# Altium PCB PCB-Thermostat.PcbDoc (part 2 of 5)
Units mm, origin at the board's own origin, x right, y up, seen from the top; angles counter-clockwise.
Board outline 100 x 90 mm, 4 copper layers (Top, PWR, GND, Bottom), stack 1.585 mm thick; 187 components, 164 nets, 696 pads, 417 vias.
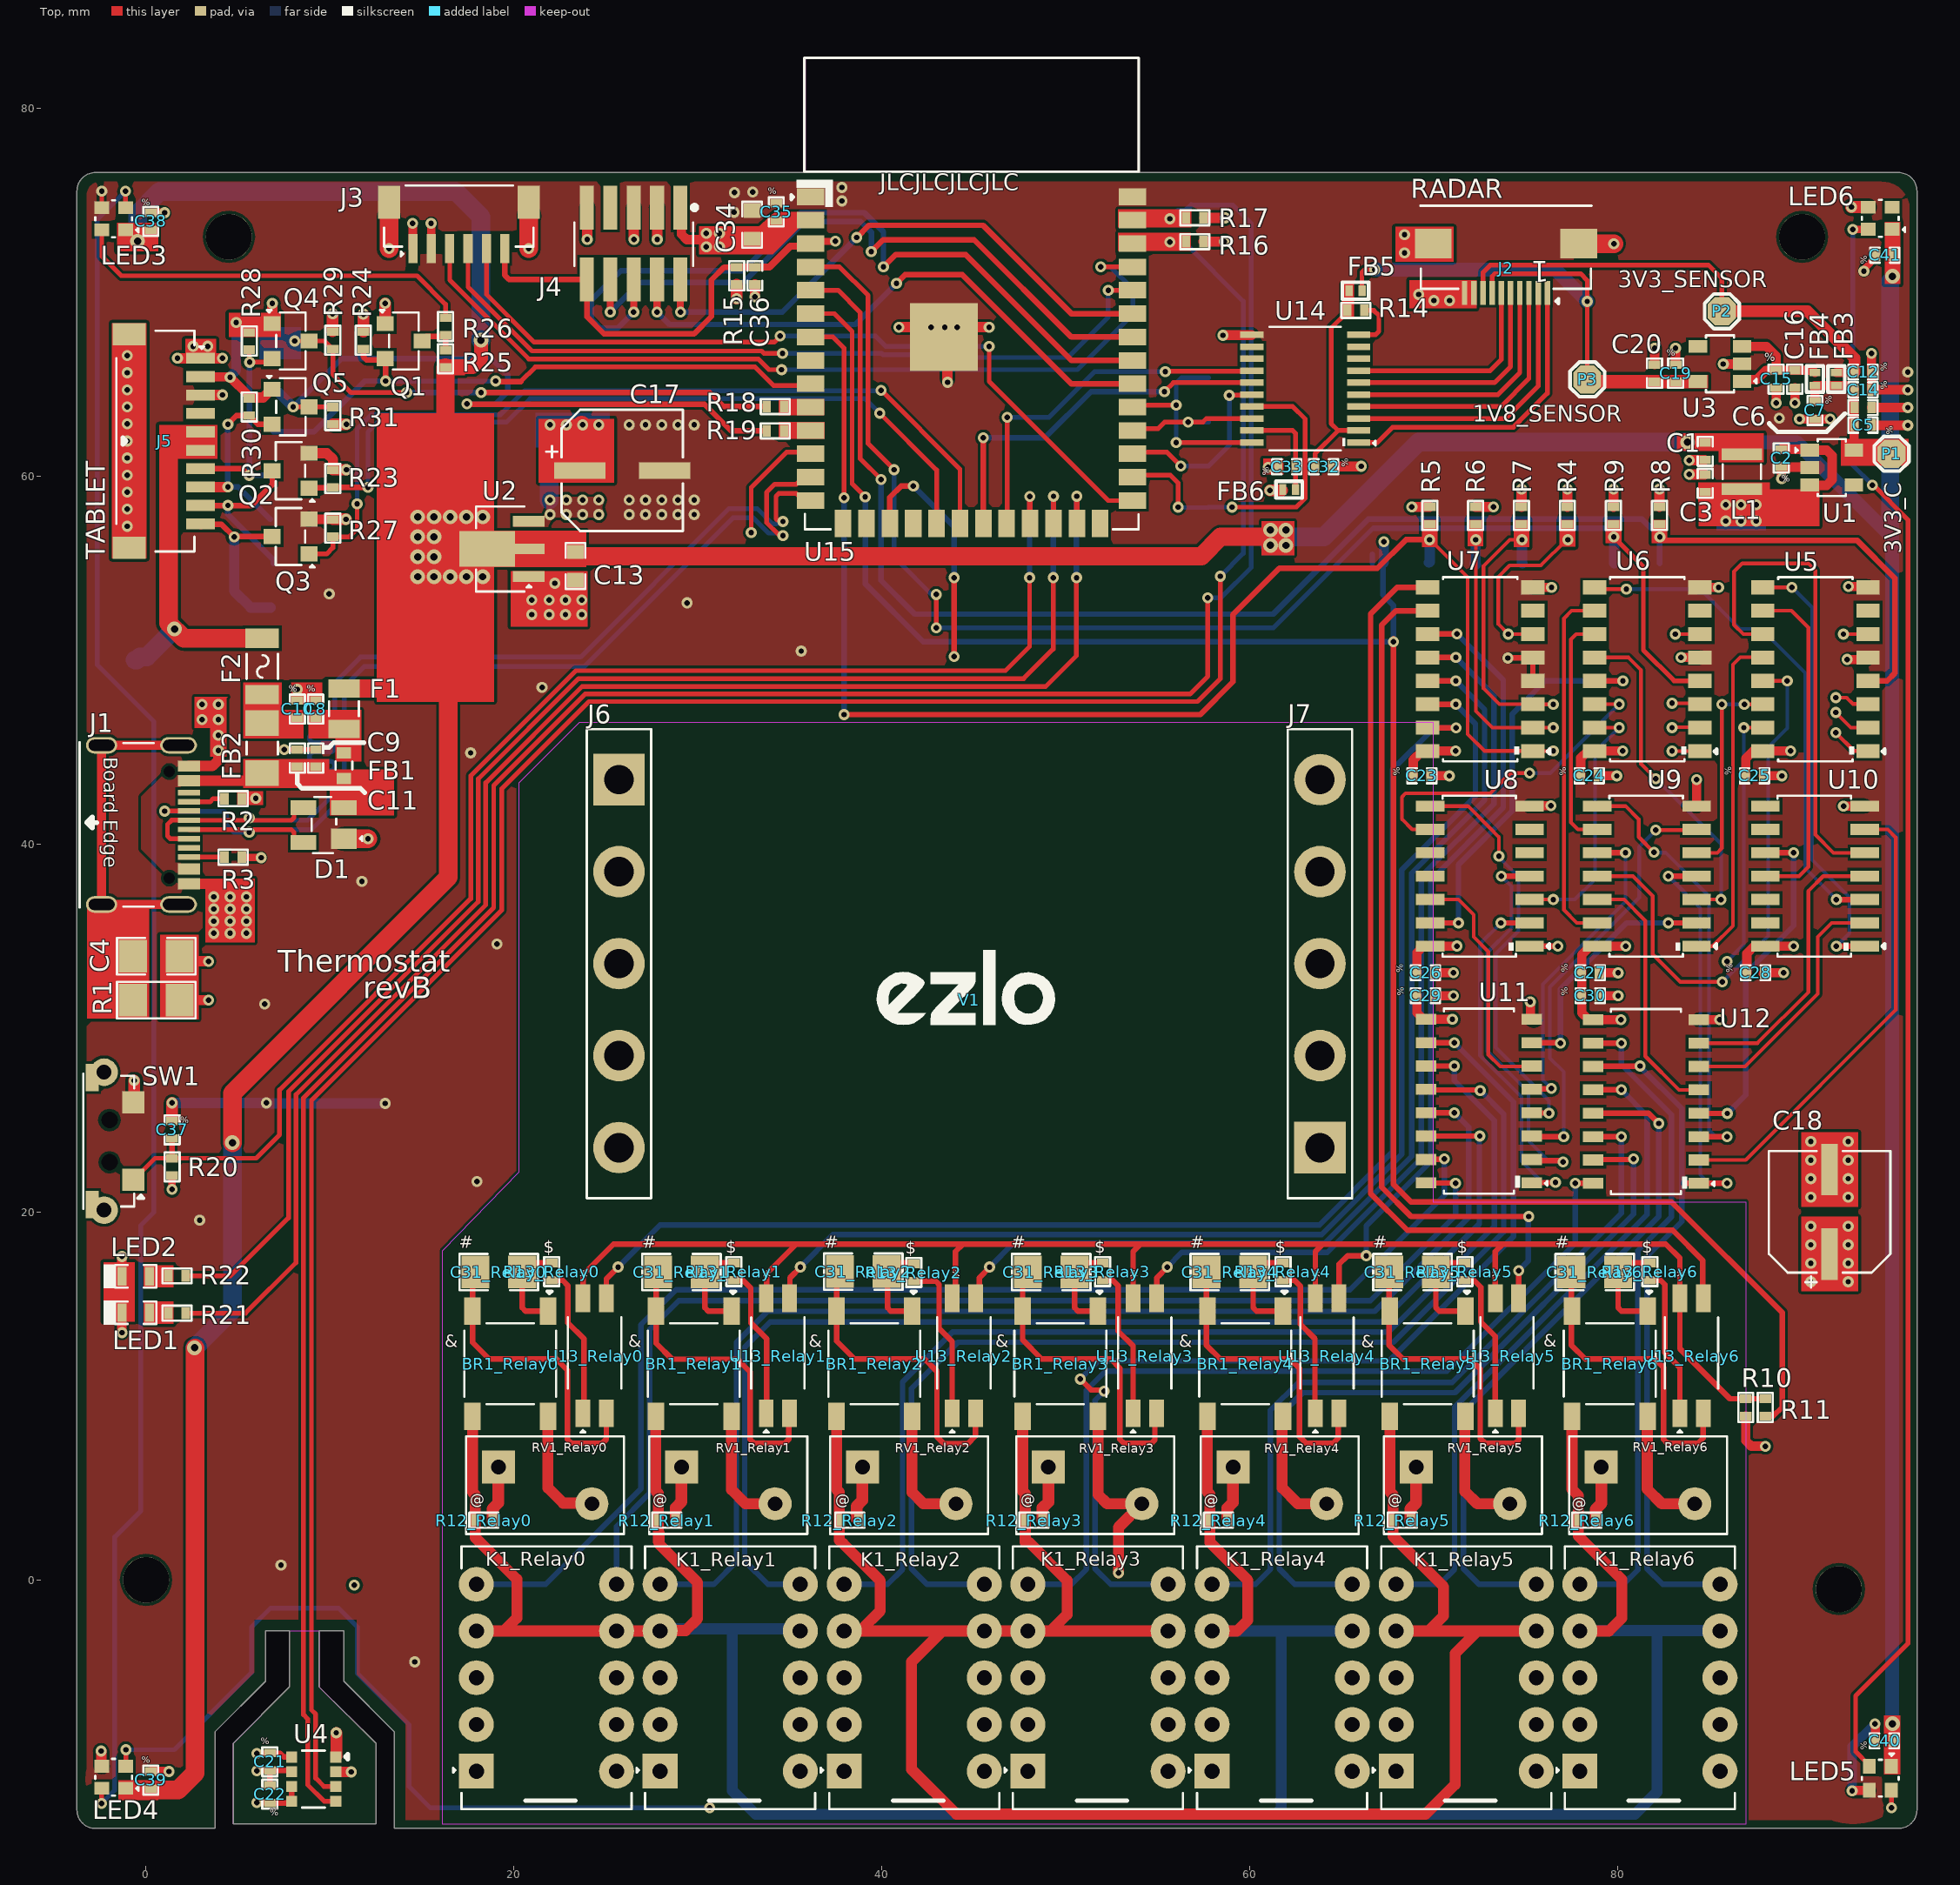
[diagram p0: Top view]

## Part data (continued)
FB3 FB4 FB5 FB6: library part BLM15PD121SN1D, "FERRITE BEAD 120 OHM 0402 1LN", Case Code (Imperial)=0402, Case Code (Metric)=1005, Current Rating=1.3A, DC Resistance (DCR)=90mR, LCSC Part Number=C76891, Manufacturer=Murata, Max Operating Temperature=125°C, Min Operating Temperature=-55°C, Package Quantity=1, Tolerance=25%, Case/Package=0402, Category="Ferrite Beads and Chips", ComponentLink1Description=https://datasheet.ciiva.com/11800/0900766b811b5866-11800860.pdf?src-supplier=RSComponents, ComponentLink1URL=https://datasheet.ciiva.com/11800/0900766b811b5866-11800860.pdf?src-supplier=RSComponents, ComponentLink2Description=https://datasheet.ciiva.com/18093/getdatasheetpartid-195858-18093157.pdf?src-supplier=Verical, ComponentLink2URL=https://datasheet.ciiva.com/18093/getdatasheetpartid-195858-18093157.pdf?src-supplier=Verical, ComponentLink3Description=https://datasheet.ciiva.com/41425/001171686-da-01-en-chip-drossel0402-120r-1300ma-1-0x0-5mm-41425776.pdf?src-supplier=Conrad, ComponentLink3URL=https://datasheet.ciiva.com/41425/001171686-da-01-en-chip-drossel0402-120r-1300ma-1-0x0-5mm-41425776.pdf?src-supplier=Conrad, ComponentLink4Description=https://datasheet.ciiva.com/41449/001172205-da-01-en-drossel-0402-120r-11-0x0-5mm-10000st-41449495.pdf?src-supplier=Conrad, ComponentLink4URL=https://datasheet.ciiva.com/41449/001172205-da-01-en-drossel-0402-120r-11-0x0-5mm-10000st-41449495.pdf?src-supplier=Conrad, ComponentLink5Description=https://datasheet.ciiva.com/1012/l0110e-1012435.pdf?src-supplier=Digi-Key, ComponentLink5URL=https://datasheet.ciiva.com/1012/l0110e-1012435.pdf?src-supplier=Digi-Key, ComponentLink6Description=https://datasheet.ciiva.com/1012/l0110e-1012434.pdf?src-supplier=Digi-Key, ComponentLink6URL=https://datasheet.ciiva.com/1012/l0110e-1012434.pdf?src-supplier=Digi-Key, ComponentLink7Description=https://datasheet.ciiva.com/1012/l0110e-1012436.pdf?src-supplier=Digi-Key, ComponentLink7URL=https://datasheet.ciiva.com/1012/l0110e-1012436.pdf?src-supplier=Digi-Key, Core Material=Ferrite, DC Current=1.3A, DC Resistance-Max=90mR, Depth=0.55mm, Height=0.5mm, Impedance=120R, Item Type="Ferrite Bead", Lead Free="Lead Free", Length=1mm, Manufacturer Part Number=BLM15PD121SN1D, Material=Steel,Ferrite, Max Current Rating=1.3A, Max DC Current=1.3A, Military Standard=Not, Number of Circuits=1, Number of Lines=1, Number of Pins=2, Packaging="Tape and Reel", Pricing 1="10000=0.03238, 20000=0.03063, 40000=0.02888, 60000=0.02713, 80000=0.02538, 100000=0.02363, 1000000=0.02188 (USD)", Radiation Hardening=No, Reach SVHC Compliant=Yes, RoHS=Yes, RoHS Compliant=Yes, Series=BLM15PD, Stock 1=300000, Supplier 1=Avnet, Supplier Part Number 1=BLM15PD121SN1D, Termination=SMD/SMT, Test Frequency=100MHz, Width=0.5mm
J1: "250mA 1 16 Female Type-C SMD USB Connectors ROHS", LCSC Part Number=C165948, Manufacturer="Korean Hroparts Elec", ComponentLink1Description=LCSC, ComponentLink1URL=https://www.lcsc.com/product-detail/USB-Connectors_Korean-Hroparts-Elec-TYPE-C-31-M-12_C165948.html, Manufacturer Part Number=TYPE-C-31-M-12
J2: "Clamshell 10 Bottom Contact Surface Mount 0.5mm SMD,P=0.5mm FFC/FPC Connectors ROHS", LCSC Part Number=C262266, Manufacturer=JUSHUO, Package=SMD,P=0.5mm, ComponentLink1Description=LCSC, ComponentLink1URL=https://www.lcsc.com/product-detail/FFC-FPC-Connectors_JUSHUO-AFC01-S10FCC-00_C262266.html, Item Type="FPC Connector", Manufacturer Part Number=AFC01-S10FCC-00
J3: library part C145963, "1x6P SH 1 1mm 6 SMD,P=1mm Wire To Board / Wire To Wire Connector ROHS", Manufacturer=BOOMELE, Package=SMD,P=1mm, ComponentLink1Description=LCSC, ComponentLink1URL=https://www.lcsc.com/product-detail/Wire-To-Board-Wire-To-Wire-Connector_BOOMELE-Boom-Precision-Elec-C145963_C145963.html, Item Type=Connector, LCSC Part Number=C145963, Manufacturer Part Number=C145963
J4: "CONN HEADER SMD 10POS 1.27MM", Color=Black, Contact Resistance=30mR, Current Rating=1A, Insulation Resistance=100MR, LCSC Part Number=C150517, Manufacturer="Amphenol FCI", Max Operating Temperature=85°C, Max Voltage Rating (AC)=125V, Min Operating Temperature=-40°C, Package Quantity=600, Supplier Part Number 1=609-3695-6-ND, ComponentLink1Description=https://www.verical.com/server-webapp/html/getDatasheet?partID=177140&src-supplier=Verical, ComponentLink1URL=https://www.verical.com/server-webapp/html/getDatasheet?partID=177140&src-supplier=Verical, ComponentLink2Description=http://portal.fciconnect.com/Comergent/fci/drawing/20021121.pdf?src-supplier=Avnet, ComponentLink2URL=http://portal.fciconnect.com/Comergent/fci/drawing/20021121.pdf?src-supplier=Avnet, ComponentLink3Description=https://cdn.amphenol-icc.com/media/wysiwyg/files/drawing/20021121.pdf?src-supplier=Digi-Key, ComponentLink3URL=https://cdn.amphenol-icc.com/media/wysiwyg/files/drawing/20021121.pdf?src-supplier=Digi-Key, ComponentLink4Description=http://portal.fciconnect.com/Comergent/fci/drawing/20021121.pdf?src-supplier=Avnet+Europe, ComponentLink4URL=http://portal.fciconnect.com/Comergent/fci/drawing/20021121.pdf?src-supplier=Avnet+Europe, ComponentLink5Description=https://media.digikey.com/pdf/Data%20Sheets/FCI%20PDFs/Minitek%20127_Catalog.pdf?src-supplier=Digi-Key, ComponentLink5URL=https://media.digikey.com/pdf/Data%20Sheets/FCI%20PDFs/Minitek%20127_Catalog.pdf?src-supplier=Digi-Key, ComponentLink6Description=http://portal.fciconnect.com/Comergent//fci/drawing/20021121.pdf?src-supplier=Mouser, ComponentLink6URL=http://portal.fciconnect.com/Comergent//fci/drawing/20021121.pdf?src-supplier=Mouser, Connector Type="Male Pin,Header", Contact Material="Copper Alloy,Copper,Gold", Contact Mating Length=0.12inch, Contact Plating=Gold, Depth=3.4mm, Gender=Male, Housing Color=Black, Housing Material=Thermoplastic, Item Type="Jtag Header", Length=6.35mm, Manufacturer Part Number=20021121-00010C4LF, Mount="Surface Mount", Number of Contacts=10, Number of Positions=10, Number of Rows=2, Orientation=Straight, Packaging="Tape and Reel", Pitch=1.27mm, Pricing 1="1=0.87, 10=0.761, 100=0.6563 (USD)", Radiation Hardening=No, REACH SVHC="No SVHC", Row Spacing=0.05inch, Stack Height=3mm, Stock 1=0, Supplier 1=Digi-Key, Termination=Solder, Voltage Rating=125V
J5: "CONN HEADER SMD R/A 10POS 1MM", Color=Natural, Contact Resistance=40mR, Current Rating=1A, Flammability Rating="UL94 V-0", Housing Color=Beige, Insulation Resistance=100MR, LCSC Part Number=C160409, Manufacturer=JST, Max Operating Temperature=85°C, Max Voltage Rating (AC)=50V, Min Operating Temperature=-25°C, Supplier Part Number 1=1165778, Category=Connectors, ComponentLink1Description=https://datasheet.ciiva.com/26894/getdatasheetpartid-708886-26894682.pdf?src-supplier=Verical, ComponentLink1URL=https://datasheet.ciiva.com/26894/getdatasheetpartid-708886-26894682.pdf?src-supplier=Verical, ComponentLink2Description=https://datasheet.ciiva.com/16221/sm10b-srss-tblfsn-16221242.pdf?src-supplier=Future+Electronics, ComponentLink2URL=https://datasheet.ciiva.com/16221/sm10b-srss-tblfsn-16221242.pdf?src-supplier=Future+Electronics, ComponentLink3Description=https://datasheet.ciiva.com/11752/0900766b8082f550-11752172.pdf?src-supplier=RSComponents, ComponentLink3URL=https://datasheet.ciiva.com/11752/0900766b8082f550-11752172.pdf?src-supplier=RSComponents, ComponentLink4Description=https://datasheet.ciiva.com/712/esr-712644.pdf?src-supplier=Digi-Key, ComponentLink4URL=https://datasheet.ciiva.com/712/esr-712644.pdf?src-supplier=Digi-Key, ComponentLink5Description=https://datasheet.ciiva.com/712/esr-712645.pdf?src-supplier=Digi-Key, ComponentLink5URL=https://datasheet.ciiva.com/712/esr-712645.pdf?src-supplier=Digi-Key, ComponentLink6Description=https://datasheet.ciiva.com/730/esr-730692.pdf?src-supplier=Digi-Key, ComponentLink6URL=https://datasheet.ciiva.com/730/esr-730692.pdf?src-supplier=Digi-Key, Connector Type=Header, Contact Finish - Mating=TIN, Contact Material="Copper Alloy", Contact Plating=Tin,Lead,Copper, Contact Shape=Square, Contact Type="Male Pin", Depth=4.95mm, Fastening Type=Pull, Gender=Male, Housing Material=Polyamide, Insulation Color=Natural, Insulation Material=Nylon, Item Type="JST Connector", Lead Free="Lead Free", Lead Pitch=1mm, Length=12mm, Manufacturer Part Number=SM10B-SRSS-TB(LF)(SN), Material=Polyamide, Max Current Rating=1A, Mount="Surface Mount", Number of Contacts=10, Number of Positions=10, Number of Rows=1, Orientation="Right Angle", Packaging="Tape and Reel", Pitch=1mm, Pricing 1="3000=0.64500 (USD)", Reach SVHC Compliant=Yes, RoHS=Yes, Series=SR, Supplier 1="Future Electronics", Termination=Solder, Voltage Rating=50V, Voltage Rating (AC)=50V
J6 J7: "PinHeader_1x05_P5.00mm_Vertical"
K1_Relay0 K1_Relay1 K1_Relay2 K1_Relay3 K1_Relay4 K1_Relay5 K1_Relay6: "Relay Gen Purpose DPDT 1A 3VDC", Coil Current=46.7mA, Coil Power=140mW, Coil Resistance=64.3R, Coil Voltage (DC)=3V, Contact Current Rating=1A, LCSC Part Number=C1560650, Manufacturer=KEMET, Max Operating Temperature=85°C, Min Operating Temperature=-40°C, Package Quantity=3600, Supplier Part Number 1=80-EA2-3TNU, Category=Uncategorized, Coil Type="Latching, Dual Coil", ComponentLink1Description=https://api.kemet.com/component-edge/download/datasheet/EA2-3TNU.pdf?src-supplier=Digi-Key, ComponentLink1URL=https://api.kemet.com/component-edge/download/datasheet/EA2-3TNU.pdf?src-supplier=Digi-Key, Contact Material=Gold,Silver, Item Type=Relay, Manufacturer Part Number=EA2-3TNU, Mount="Through Hole", Operate Time=2ms, Packaging=Rail/Tube, Pricing 1="1=3.85000, 10=3.11000, 50=3.11000, 100=2.42000, 250=2.00000, 500=1.85000, 1000=1.85000, 3600=1.58000, 10000=1.58000 (USD)", Relay Type="General Purpose", Release Time=1ms, RoHS=No, RoHS Compliant=No, Stock 1=873, Supplier 1=Mouser, Termination="PC Pin", Throw Configuration=DPDT
L1: library part VLS252012HBX-100M-1, "FIXED IND 10UH 1A 540 MOHM SMD", Case Code (Imperial)=1008, Case Code (Metric)=2520, Current Rating=1A, DC Resistance (DCR)=540mR, Inductance Tolerance=20%, LCSC Part Number=C88532, Manufacturer=TDK, Max Operating Temperature=105°C, Min Operating Temperature=-40°C, Resistor Type=Wirewound, Saturation Current=850mA, Test Frequency=1MHz, Case/Package=1008, Category="Fixed Inductors", ComponentLink1Description=http://www.farnell.com/datasheets/1866267.pdf?src-supplier=Farnell, ComponentLink1URL=http://www.farnell.com/datasheets/1866267.pdf?src-supplier=Farnell, ComponentLink2Description=http://www.farnell.com/datasheets/2608160.pdf?src-supplier=Farnell, ComponentLink2URL=http://www.farnell.com/datasheets/2608160.pdf?src-supplier=Farnell, ComponentLink3Description=http://www.farnell.com/datasheets/2130011.pdf?src-supplier=Element14, ComponentLink3URL=http://www.farnell.com/datasheets/2130011.pdf?src-supplier=Element14, ComponentLink4Description=http://www.farnell.com/datasheets/1866267.pdf?src-supplier=Newark, ComponentLink4URL=http://www.farnell.com/datasheets/1866267.pdf?src-supplier=Newark, ComponentLink5Description=https://product.tdk.com/info/en/catalog/datasheets/inductor_commercial_power_vls252012hbx-1_en.pdf?src-supplier=Digi-Key, ComponentLink5URL=https://product.tdk.com/info/en/catalog/datasheets/inductor_commercial_power_vls252012hbx-1_en.pdf?src-supplier=Digi-Key, ComponentLink6Description=https://product.tdk.com/info/en/catalog/datasheets/inductor_commercial_power_vls252012hbx-1_en.pdf?ref_disty=digikey&src-supplier=Digi-Key, ComponentLink6URL=https://product.tdk.com/info/en/catalog/datasheets/inductor_commercial_power_vls252012hbx-1_en.pdf?ref_disty=digikey&src-supplier=Digi-Key, Core Material=Metal, Height - Seated (Max)=0.047inch, Inductance=10uH, Item Type=Inductor, Length=0.098inch, Manufacturer Part Number=VLS252012HBX-100M-1, Mount="Surface Mount", Packaging="Cut Tape", Pricing 1="2000=0.12770, 24000=0.12640 (USD)", Reach SVHC Compliant=Yes, RMS Current (Irms)=1A, RoHS=Yes, RoHS Compliant=Yes, Series=VLS-HBX-1, Shielding=Shielded, Stock 1=10000, Supplier 1="Arrow Electronics", Supplier Part Number 1=VLS252012HBX-100M-1, Tolerance=20%, Width=0.079inch
LED1: library part 19-21/R7C-AK1L2BY/3T, "Red 632nm LED Indication - Discrete 2.05V 0603 (1608 Metric)", LCSC Part Number=C1322287, Manufacturer="Everlight Elec", Package=0603, ComponentLink1Description=LCSC, ComponentLink1URL=https://www.lcsc.com/product-detail/Light-Emitting-Diodes-LED_Everlight-Elec-19-21-R7C-AK1L2BY-3T_C1322287.html, Item Type=LED, Manufacturer Part Number=19-21/R7C-AK1L2BY/3T
LED2: library part 19-21/G6C-FM1N2B/3T, "Yellow-Green 572nm LED Indication - Discrete 2.05V 0603 (1608 Metric)", LCSC Part Number=C93689, Manufacturer="Everlight Elec", Package=0603, ComponentLink1Description=LCSC, ComponentLink1URL=https://www.lcsc.com/product-detail/Light-Emitting-Diodes-LED_Everlight-Elec-19-21-G6C-FM1N2B-3T_C93689.html, Item Type=LED, Manufacturer Part Number=19-21/G6C-FM1N2B/3T
LED3 LED4 LED5 LED6: "5mA -40℃~+80℃ RGB SMD,2x2mm Light Emitting Diodes (LED) ROHS", LCSC Part Number=C2909058, Manufacturer="OPSCO Optoelectronics", Package=SMD,2x2mm, ComponentLink1Description=LCSC, ComponentLink1URL=https://www.lcsc.com/product-detail/Light-Emitting-Diodes-LED_OPSCO-Optoelectronics-SK6812-EC20_C2909058.html, Item Type="RGB LED", Manufacturer Part Number=SK6812-EC20
P1 P2 P3 P4 P5 P6 P7 P8 P9 P10 P11 P12 P13 P14 P15 P16 P17 P18 P19 P20 P21 P22 P23 P24 P25: "Test Point ON"
Q1 Q2 Q3 Q4 Q5: "N-CHANNEL 20-V (D-S) MOSFET", LCSC Part Number=C5310968, Manufacturer="TECH PUBLIC", Manufacturer Part Number=SI2302CDS, Package=SOT-23, ComponentLink1Description=LCSC, ComponentLink1URL=https://www.lcsc.com/product-detail/MOSFETs_TECH-PUBLIC-SI2302CDS_C5310968.html, Item Type=Mosfet
R1: library part RC1206FR-071ML, "RES 1M OHM 1% 1/4W 1206", Case Code (Imperial)=1206, Case Code (Metric)=3216, LCSC Part Number=C108083, Manufacturer=Yageo, Max Operating Temperature=155°C, Max Power Dissipation=250mW, Min Operating Temperature=-55°C, Package Quantity=5000, Resistance=1MR, Resistance Tolerance=1%, Resistor Type="Thick Film", Temperature Coefficient=100ppm/°C, Voltage Rating=200V, Case/Package=1206, Category="Chip SMD Resistors", ComponentLink1Description=https://datasheet.ciiva.com/11819/0900766b80c6630a-11819912.pdf?src-supplier=RSComponents, ComponentLink1URL=https://datasheet.ciiva.com/11819/0900766b80c6630a-11819912.pdf?src-supplier=RSComponents, ComponentLink2Description=https://datasheet.ciiva.com/46445/444357-46445709.pdf?src-supplier=Element14, ComponentLink2URL=https://datasheet.ciiva.com/46445/444357-46445709.pdf?src-supplier=Element14, ComponentLink3Description=https://datasheet.ciiva.com/7857/444357-7857289.pdf?src-supplier=Element14, ComponentLink3URL=https://datasheet.ciiva.com/7857/444357-7857289.pdf?src-supplier=Element14, ComponentLink4Description=https://datasheet.ciiva.com/7857/444357-7857288.pdf?src-supplier=Element14, ComponentLink4URL=https://datasheet.ciiva.com/7857/444357-7857288.pdf?src-supplier=Element14, ComponentLink5Description=https://datasheet.ciiva.com/17033/pyu-rc1206-51-rohs-l-4-17033611.pdf?src-supplier=Future+Electronics, ComponentLink5URL=https://datasheet.ciiva.com/17033/pyu-rc1206-51-rohs-l-4-17033611.pdf?src-supplier=Future+Electronics, Construction=Rectangular, Depth=1.6mm, Features="Moisture Resistant", Height=0.55mm, Item Type=Resistor, Lead Free="Lead Free", Length=3.1mm, Manufacturer Part Number=RC1206FR-071ML, Military Standard=Not, Number of Terminations=2, Packaging="Tape and Reel", Power Rating=250mW, Pricing 1="5000=0.00412, 10000=0.00406, 20000=0.00394 (USD)", RoHS=Yes, RoHS Compliant=Yes, Series=RC, Size Code=1206, Stock 1=935000, Supplier 1=Avnet, Supplier Part Number 1=RC1206FR-071ML, Technology="THICK FILM", Termination=SMD/SMT, Tolerance=1%, Width=1.6mm
R2 R3: library part RC0402FR-075K1L, "RES 5.1K OHM 1% 1/16W 0402", Case Code (Imperial)=0402, Case Code (Metric)=1005, LCSC Part Number=C137973, Manufacturer=Yageo, Max Operating Temperature=155°C, Max Power Dissipation=63mW, Min Operating Temperature=-55°C, Package Quantity=1, Resistance=5.1kR, Resistance Tolerance=1%, Resistor Type="Thick Film", Temperature Coefficient=100ppm/°C, Voltage Rating=50V, Case/Package=0402, Category="Chip SMD Resistors", ComponentLink1Description=https://datasheet.ciiva.com/7983/1018594-7983519.pdf?src-supplier=Element14, ComponentLink1URL=https://datasheet.ciiva.com/7983/1018594-7983519.pdf?src-supplier=Element14, ComponentLink2Description=https://datasheet.ciiva.com/46394/1018594-46394936.pdf?src-supplier=Element14, ComponentLink2URL=https://datasheet.ciiva.com/46394/1018594-46394936.pdf?src-supplier=Element14, ComponentLink3Description=https://datasheet.ciiva.com/2453/pyu-r-int-thick-7-2453401.pdf?src-supplier=Digi-Key, ComponentLink3URL=https://datasheet.ciiva.com/2453/pyu-r-int-thick-7-2453401.pdf?src-supplier=Digi-Key, ComponentLink4Description=https://datasheet.ciiva.com/2453/pyu-r-int-thick-7-2453402.pdf?src-supplier=Digi-Key, ComponentLink4URL=https://datasheet.ciiva.com/2453/pyu-r-int-thick-7-2453402.pdf?src-supplier=Digi-Key, ComponentLink5Description=https://datasheet.ciiva.com/2453/pyu-r-int-thick-7-2453400.pdf?src-supplier=Digi-Key, ComponentLink5URL=https://datasheet.ciiva.com/2453/pyu-r-int-thick-7-2453400.pdf?src-supplier=Digi-Key, ComponentLink6Description=https://datasheet.ciiva.com/12558/pyu-rc0402-51-rohs-l-6-r-8721-12558460.pdf?src-supplier=Mouser, ComponentLink6URL=https://datasheet.ciiva.com/12558/pyu-rc0402-51-rohs-l-6-r-8721-12558460.pdf?src-supplier=Mouser, ComponentLink7Description=https://datasheet.ciiva.com/16744/pyu-rc0402-51-rohs-l-6-r-16744283.pdf?src-supplier=Future+Electronics, ComponentLink7URL=https://datasheet.ciiva.com/16744/pyu-rc0402-51-rohs-l-6-r-16744283.pdf?src-supplier=Future+Electronics, ComponentLink8Description=https://datasheet.ciiva.com/15189/getdatasheetpartid-323636-15189493.pdf?src-supplier=Verical, ComponentLink8URL=https://datasheet.ciiva.com/15189/getdatasheetpartid-323636-15189493.pdf?src-supplier=Verical, Construction=Rectangular, Depth=0.5mm, Features="Moisture Resistant", Height=0.016inch, Item Type=0402, Lead Free="Lead Free", Length=1mm, Manufacturer Part Number=RC0402FR-075K1L, Military Standard=Not, Number of Terminations=2, Packaging="Tape and Reel", Power Rating=63mW, Pricing 1="10000=0.00085 (USD)", RoHS=Yes, RoHS Compliant=Yes, Series=RC, Stock 1=65000, Supplier 1=Avnet, Supplier Part Number 1=RC0402FR-075K1L, Technology="THICK FILM", Termination=SMD/SMT, Tolerance=1%, Voltage Rating (DC)=50V, Width=0.02inch, Working Voltage=50V
R4 R5 R6 R7 R8 R9 R10 R15 R20 R23 R27: library part RC0402FR-07220KL, "RES 220K OHM 1% 1/16W 0402", Case Code (Imperial)=0402, Case Code (Metric)=1005, Manufacturer=Yageo, Max Operating Temperature=155°C, Max Power Dissipation=63mW, Min Operating Temperature=-55°C, Package Quantity=1, Power Rating=62.5mW, Resistance=220kR, Resistance Tolerance=1%, Resistor Type="Thick Film", Supplier Part Number 1=311-220KLRCT-ND, Temperature Coefficient=100ppm/°C, Voltage Rating=50V, Case/Package=0402, Category="Chip SMD Resistors", ComponentLink1Description=https://datasheet.ciiva.com/11808/0900766b80c66297-11808792.pdf?src-supplier=RSComponents, ComponentLink1URL=https://datasheet.ciiva.com/11808/0900766b80c66297-11808792.pdf?src-supplier=RSComponents, ComponentLink2Description=https://datasheet.ciiva.com/5924/1018594-5924944.pdf?src-supplier=Farnell, ComponentLink2URL=https://datasheet.ciiva.com/5924/1018594-5924944.pdf?src-supplier=Farnell, ComponentLink3Description=https://datasheet.ciiva.com/2453/pyu-r-int-thick-7-2453533.pdf?src-supplier=Digi-Key, ComponentLink3URL=https://datasheet.ciiva.com/2453/pyu-r-int-thick-7-2453533.pdf?src-supplier=Digi-Key, ComponentLink4Description=https://datasheet.ciiva.com/2453/pyu-r-int-thick-7-2453534.pdf?src-supplier=Digi-Key, ComponentLink4URL=https://datasheet.ciiva.com/2453/pyu-r-int-thick-7-2453534.pdf?src-supplier=Digi-Key, ComponentLink5Description=https://datasheet.ciiva.com/2453/pyu-r-int-thick-7-2453532.pdf?src-supplier=Digi-Key, ComponentLink5URL=https://datasheet.ciiva.com/2453/pyu-r-int-thick-7-2453532.pdf?src-supplier=Digi-Key, ComponentLink6Description=https://datasheet.ciiva.com/12577/pyu-rc0402-51-rohs-l-6-r-12577270.pdf?src-supplier=Mouser, ComponentLink6URL=https://datasheet.ciiva.com/12577/pyu-rc0402-51-rohs-l-6-r-12577270.pdf?src-supplier=Mouser, Construction=Rectangular, Depth=0.5mm, Features="Moisture Resistant", Height=0.016inch, Lead Free="Lead Free", Length=1mm, Manufacturer Part Number=RC0402FR-07220KL, Military Standard=Not, Number of Terminations=2, Packaging="Tape and Reel", Pricing 1="1=0.10000, 10=0.01400, 100=0.00580, 1000=0.00262, 2500=0.00228, 5000=0.00188 (USD)", Reach SVHC Compliant=Yes, RoHS=Yes, RoHS Compliant=Yes, Series=RC, Size Code=0402, Stock 1=1192792, Supplier 1=Digi-Key, Technology="THICK FILM", Termination=SMD/SMT, Tolerance=1%, Weight=2.3E-05oz, Width=0.02inch
R11: library part RC0402FR-0747KL, "RES 47K OHM 1% 1/16W 0402", Case Code (Imperial)=0402, Case Code (Metric)=1005, LCSC Part Number=C93943, Manufacturer=Yageo, Max Operating Temperature=155°C, Max Power Dissipation=63mW, Min Operating Temperature=-55°C, Package Quantity=1, Power Rating=62.5mW, Resistance=47kR, Resistance Tolerance=1%, Resistor Type="Thick Film", Temperature Coefficient=100ppm/°C, Voltage Rating=50V, Case/Package=0402, Category="Chip SMD Resistors", ComponentLink1Description=https://datasheet.ciiva.com/46412/1018594-46412839.pdf?src-supplier=Element14, ComponentLink1URL=https://datasheet.ciiva.com/46412/1018594-46412839.pdf?src-supplier=Element14, ComponentLink2Description=https://datasheet.ciiva.com/2453/pyu-r-int-thick-7-2453389.pdf?src-supplier=Digi-Key, ComponentLink2URL=https://datasheet.ciiva.com/2453/pyu-r-int-thick-7-2453389.pdf?src-supplier=Digi-Key, ComponentLink3Description=https://datasheet.ciiva.com/2453/pyu-r-int-thick-7-2453390.pdf?src-supplier=Digi-Key, ComponentLink3URL=https://datasheet.ciiva.com/2453/pyu-r-int-thick-7-2453390.pdf?src-supplier=Digi-Key, ComponentLink4Description=https://datasheet.ciiva.com/2453/pyu-r-int-thick-7-2453388.pdf?src-supplier=Digi-Key, ComponentLink4URL=https://datasheet.ciiva.com/2453/pyu-r-int-thick-7-2453388.pdf?src-supplier=Digi-Key, ComponentLink5Description=https://datasheet.ciiva.com/15189/getdatasheetpartid-323748-15189466.pdf?src-supplier=Verical, ComponentLink5URL=https://datasheet.ciiva.com/15189/getdatasheetpartid-323748-15189466.pdf?src-supplier=Verical, ComponentLink6Description=https://datasheet.ciiva.com/16793/pyu-rc0402-51-rohs-l-6-r-16793430.pdf?src-supplier=Future+Electronics, ComponentLink6URL=https://datasheet.ciiva.com/16793/pyu-rc0402-51-rohs-l-6-r-16793430.pdf?src-supplier=Future+Electronics, Construction=Rectangular, Depth=0.5mm, Features="Moisture Resistant", Height=0.016inch, Item Type=Resistor, Lead Free="Lead Free", Length=1mm, Manufacturer Part Number=RC0402FR-0747KL, Military Standard=Not, Number of Terminations=2, Packaging="Tape and Reel", Pricing 1="10000=0.00085, 20000=0.00087, 40000=0.00084, 60000=0.00083, 80000=0.00079, 100000=0.00078, 1000000=0.00076 (USD)", RoHS=Yes, RoHS Compliant=Yes, Series=RC, Size Code=0402, Stock 1=680000, Supplier 1=Avnet, Supplier Part Number 1=RC0402FR-0747KL, Termination=SMD/SMT, Tolerance=1%, Width=0.02inch
R12_Relay0 R12_Relay1 R12_Relay2 R12_Relay3 R12_Relay4 R12_Relay5 R12_Relay6: library part RC0402FR-0747RL, "RES 47 OHM 1% 1/16W 0402", Case Code (Imperial)=0402, Case Code (Metric)=1005, Manufacturer=Yageo, Max Operating Temperature=155°C, Max Power Dissipation=63mW, Min Operating Temperature=-55°C, Package Quantity=1, Resistance Tolerance=1%, Resistor Type="Thick Film", Supplier Part Number 1=311-47.0LRCT-ND, Temperature Coefficient=100ppm/°C, Voltage Rating=50V, Case/Package=0402, Category="Chip SMD Resistors", Construction=Rectangular, Depth=0.5mm, Features="Moisture Resistant", Height=0.016inch, Lead Free="Lead Free", Length=1mm, Manufacturer Part Number=RC0402FR-0747RL, Military Standard=Not, Number of Terminations=2, Packaging="Tape and Reel", Power Rating=63mW, Pricing 1="1=0.10000, 10=0.01400, 100=0.00580, 1000=0.00262, 2500=0.00228, 5000=0.00188 (USD)", Resistance=47R, RoHS=Yes, RoHS Compliant=Yes, Series=RC, Size Code=0402, Stock 1=913647, Supplier 1=Digi-Key, Technology="THICK FILM", Termination=SMD/SMT, Tolerance=1%, Weight=2.3E-05oz, Width=0.02inch
R13_Relay0 R13_Relay1 R13_Relay2 R13_Relay3 R13_Relay4 R13_Relay5 R13_Relay6: library part RC0402FR-07100KL, "RES 100K OHM 1% 1/16W 0402", Case Code (Imperial)=0402, Case Code (Metric)=1005, Manufacturer=Yageo, Max Operating Temperature=155°C, Max Power Dissipation=63mW, Min Operating Temperature=-55°C, Package Quantity=1, Resistance=100kR, Resistance Tolerance=1%, Resistor Type="Thick Film", Supplier Part Number 1=603-RC0402FR-07100KL, Temperature Coefficient=100ppm/°C, Voltage Rating=50V, Case/Package=0402, Category="Chip SMD Resistors", ComponentLink1Description=https://datasheet.ciiva.com/11819/0900766b80c66297-11819452.pdf?src-supplier=RSComponents, ComponentLink1URL=https://datasheet.ciiva.com/11819/0900766b80c66297-11819452.pdf?src-supplier=RSComponents, ComponentLink2Description=https://datasheet.ciiva.com/22747/1018594-22747509.pdf?src-supplier=Element14, ComponentLink2URL=https://datasheet.ciiva.com/22747/1018594-22747509.pdf?src-supplier=Element14, ComponentLink3Description=https://datasheet.ciiva.com/2453/pyu-r-int-thick-7-2453362.pdf?src-supplier=Digi-Key, ComponentLink3URL=https://datasheet.ciiva.com/2453/pyu-r-int-thick-7-2453362.pdf?src-supplier=Digi-Key, ComponentLink4Description=https://datasheet.ciiva.com/2453/pyu-r-int-thick-7-2453363.pdf?src-supplier=Digi-Key, ComponentLink4URL=https://datasheet.ciiva.com/2453/pyu-r-int-thick-7-2453363.pdf?src-supplier=Digi-Key, ComponentLink5Description=https://datasheet.ciiva.com/2453/pyu-r-int-thick-7-2453361.pdf?src-supplier=Digi-Key, ComponentLink5URL=https://datasheet.ciiva.com/2453/pyu-r-int-thick-7-2453361.pdf?src-supplier=Digi-Key, ComponentLink6Description=https://datasheet.ciiva.com/12667/pyu-rc0402-51-rohs-l-6-r-12667930.pdf?src-supplier=Mouser, ComponentLink6URL=https://datasheet.ciiva.com/12667/pyu-rc0402-51-rohs-l-6-r-12667930.pdf?src-supplier=Mouser, ComponentLink7Description=https://datasheet.ciiva.com/15189/getdatasheetpartid-323696-15189334.pdf?src-supplier=Verical, ComponentLink7URL=https://datasheet.ciiva.com/15189/getdatasheetpartid-323696-15189334.pdf?src-supplier=Verical, Construction=Rectangular, Depth=0.5mm, Features="Moisture Resistant", Height=0.016inch, Lead Free="Lead Free", Length=0.039inch, Manufacturer Part Number=RC0402FR-07100KL, Military Standard=Not, Number of Terminations=2, Packaging="Tape and Reel", Power Rating=63mW, Pricing 1="1=0.10000, 10=0.01200, 50=0.01200, 100=0.00500, 1000=0.00300, 2500=0.00200, 10000=0.00100 (USD)", REACH SVHC="No SVHC", RoHS=Yes, RoHS Compliant=Yes, Series=RC, Stock 1=7759549, Supplier 1=Mouser, Technology="THICK FILM", Termination=SMD/SMT, Tolerance=1%, Width=0.02inch, Working Voltage=50V
R14: library part RC0402FR-070RL, "RES 0 OHM JUMPER 1/16W 0402", Case Code (Imperial)=0402, Case Code (Metric)=1005, LCSC Part Number=C106231, Manufacturer=Yageo, Max Operating Temperature=155°C, Max Power Dissipation=63mW, Min Operating Temperature=-55°C, Power Rating=62.5mW, Resistor Type="Thick Film", Supplier Part Number 1=603-RC0402FR-070RL, Temperature Coefficient=200ppm/°C, Tolerance=1%, Voltage Rating=50V, Case/Package=0402, Category="Chip SMD Resistors", ComponentLink1Description=https://datasheet.ciiva.com/8896/pyu-rc0402-51-rohs-l-6-8896149.pdf?src-supplier=Avnet, ComponentLink1URL=https://datasheet.ciiva.com/8896/pyu-rc0402-51-rohs-l-6-8896149.pdf?src-supplier=Avnet, ComponentLink2Description=https://datasheet.ciiva.com/16790/pyu-rc0402-51-rohs-l-6-r-16790444.pdf?src-supplier=Future+Electronics, ComponentLink2URL=https://datasheet.ciiva.com/16790/pyu-rc0402-51-rohs-l-6-r-16790444.pdf?src-supplier=Future+Electronics, Contact Plating=Tin,Matte, Features="Moisture Resistant", Height=0.35mm, Lead Free="Lead Free", Length=1mm, Manufacturer Part Number=RC0402FR-070RL, Mount="Surface Mount", Number of Terminations=2, Packaging="Tape and Reel", Pricing 1="1=0.10000, 10=0.01400, 50=0.01400, 100=0.00600, 1000=0.00300, 5000=0.00200, 10000=0.00100 (USD)", Radiation Hardening=No, Resistance=0R, RoHS=Yes, RoHS Compliant=Yes, Series=RC, Size Code=0402, Stock 1=8556842, Supplier 1=Mouser, Termination=SMD/SMT, Width=0.5mm
R16 R17: library part RC0402FR-074K7L, "RES 4.7K OHM 1% 1/16W 0402", Case Code (Imperial)=0402, Case Code (Metric)=1005, LCSC Part Number=C105871, Manufacturer=Yageo, Max Operating Temperature=155°C, Max Power Dissipation=63mW, Min Operating Temperature=-55°C, Power Rating=62.5mW, Resistance=4.7kR, Resistance Tolerance=1%, Resistor Type="Thick Film", Temperature Coefficient=100ppm/°C, Voltage Rating=50V, Case/Package=0402, Category="Chip SMD Resistors", ComponentLink1Description=https://datasheet.ciiva.com/22661/1686128-22661342.pdf?src-supplier=Element14, ComponentLink1URL=https://datasheet.ciiva.com/22661/1686128-22661342.pdf?src-supplier=Element14, ComponentLink2Description=https://datasheet.ciiva.com/7850/1018594-7850022.pdf?src-supplier=Element14, ComponentLink2URL=https://datasheet.ciiva.com/7850/1018594-7850022.pdf?src-supplier=Element14, ComponentLink3Description=https://datasheet.ciiva.com/7850/1018594-7850023.pdf?src-supplier=Element14, ComponentLink3URL=https://datasheet.ciiva.com/7850/1018594-7850023.pdf?src-supplier=Element14, ComponentLink4Description=https://datasheet.ciiva.com/15215/getdatasheetpartid-328119-15215035.pdf?src-supplier=Verical, ComponentLink4URL=https://datasheet.ciiva.com/15215/getdatasheetpartid-328119-15215035.pdf?src-supplier=Verical, Construction=Rectangular, Depth=0.5mm, Features="Moisture Resistant", Height=0.32mm, Height - Seated (Max)=0.016inch, Item Type=Resistor, Lead Free="Lead Free", Length=1mm, Manufacturer Part Number=RC0402FR-074K7L, Military Standard=Not, Number of Pins=2, Number of Terminations=2, Packaging="Tape and Reel", Pricing 1="10000=0.00085 (USD)", Reach SVHC Compliant=Yes, RoHS=Yes, RoHS Compliant=Yes, Series=RC, Size Code=0402, Stock 1=2420000, Supplier 1=Avnet, Supplier Part Number 1=RC0402FR-074K7L, Termination=SMD/SMT, Tolerance=1%, Voltage Rating (DC)=50V, Width=0.5mm
R18 R19: library part RC0402FR-0722RL, "RES 22 OHM 1% 1/16W 0402", Case Code (Imperial)=0402, Case Code (Metric)=1005, LCSC Part Number=C114765, Manufacturer=Yageo, Max Operating Temperature=155°C, Max Power Dissipation=63mW, Min Operating Temperature=-55°C, Power Rating=62.5mW, Resistance Tolerance=1%, Resistor Type="Thick Film", Temperature Coefficient=100ppm/°C, Voltage Rating=50V, Case/Package=0402, Category="Chip SMD Resistors", ComponentLink1Description=https://datasheet.ciiva.com/11819/0900766b80c66297-11819462.pdf?src-supplier=RSComponents, ComponentLink1URL=https://datasheet.ciiva.com/11819/0900766b80c66297-11819462.pdf?src-supplier=RSComponents, ComponentLink2Description=https://datasheet.ciiva.com/7849/1018594-7849912.pdf?src-supplier=Element14, ComponentLink2URL=https://datasheet.ciiva.com/7849/1018594-7849912.pdf?src-supplier=Element14, ComponentLink3Description=https://datasheet.ciiva.com/7849/1018594-7849911.pdf?src-supplier=Element14, ComponentLink3URL=https://datasheet.ciiva.com/7849/1018594-7849911.pdf?src-supplier=Element14, ComponentLink4Description=https://datasheet.ciiva.com/16930/pyu-rc0402-51-rohs-l-6-r-16930687.pdf?src-supplier=Future+Electronics, ComponentLink4URL=https://datasheet.ciiva.com/16930/pyu-rc0402-51-rohs-l-6-r-16930687.pdf?src-supplier=Future+Electronics, ComponentLink5Description=https://datasheet.ciiva.com/26829/getdatasheetpartid-554995-26829991.pdf?src-supplier=Verical, ComponentLink5URL=https://datasheet.ciiva.com/26829/getdatasheetpartid-554995-26829991.pdf?src-supplier=Verical, Construction=Rectangular, Depth=0.5mm, Features="Moisture Resistant", Height=0.32mm, Item Type=Resistor, Lead Free="Lead Free", Length=1mm, Manufacturer Part Number=RC0402FR-0722RL, Military Standard=Not, Number of Pins=2, Number of Terminations=2, Packaging="Tape and Reel", Pricing 1="10000=0.00085 (USD)", Reach SVHC Compliant=Yes, Resistance=22R, RoHS=Yes, RoHS Compliant=Yes, Series=RC, Size Code=0402, Stock 1=1810000, Supplier 1=Avnet, Supplier Part Number 1=RC0402FR-0722RL, Technology="THICK FILM", Termination=SMD/SMT, Tolerance=1%, Voltage Rating (DC)=50V, Width=0.5mm
R21 R22 R26: library part RC0402FR-071KL, "RES 1K OHM 1% 1/16W 0402", Case Code (Imperial)=0402, Case Code (Metric)=1005, LCSC Part Number=C106235, Manufacturer=Yageo, Max Operating Temperature=155°C, Max Power Dissipation=63mW, Min Operating Temperature=-55°C, Power Rating=62.5mW, Resistance=1kR, Resistance Tolerance=1%, Resistor Type="Thick Film", Temperature Coefficient=100ppm/°C, Voltage Rating=50V, Case/Package=0402, Category="Chip SMD Resistors", ComponentLink1Description=https://datasheet.ciiva.com/11819/0900766b80c66297-11819477.pdf?src-supplier=RSComponents, ComponentLink1URL=https://datasheet.ciiva.com/11819/0900766b80c66297-11819477.pdf?src-supplier=RSComponents, ComponentLink2Description=https://datasheet.ciiva.com/7983/1018594-7983502.pdf?src-supplier=Element14, ComponentLink2URL=https://datasheet.ciiva.com/7983/1018594-7983502.pdf?src-supplier=Element14, ComponentLink3Description=https://datasheet.ciiva.com/22747/1018594-22747513.pdf?src-supplier=Element14, ComponentLink3URL=https://datasheet.ciiva.com/22747/1018594-22747513.pdf?src-supplier=Element14, ComponentLink4Description=https://datasheet.ciiva.com/12666/pyu-rc0402-51-rohs-l-6-r-12666741.pdf?src-supplier=Mouser, ComponentLink4URL=https://datasheet.ciiva.com/12666/pyu-rc0402-51-rohs-l-6-r-12666741.pdf?src-supplier=Mouser, ComponentLink5Description=https://datasheet.ciiva.com/7849/1018594-7849869.pdf?src-supplier=Element14, ComponentLink5URL=https://datasheet.ciiva.com/7849/1018594-7849869.pdf?src-supplier=Element14, ComponentLink6Description=https://datasheet.ciiva.com/7849/1018594-7849871.pdf?src-supplier=Element14, ComponentLink6URL=https://datasheet.ciiva.com/7849/1018594-7849871.pdf?src-supplier=Element14, ComponentLink7Description=https://datasheet.ciiva.com/17063/pyu-rc0402-51-rohs-l-6-r-17063193.pdf?src-supplier=Future+Electronics, ComponentLink7URL=https://datasheet.ciiva.com/17063/pyu-rc0402-51-rohs-l-6-r-17063193.pdf?src-supplier=Future+Electronics, Construction=Rectangular, Depth=0.5mm, Features="Moisture Resistant", Height=0.32mm, Item Type=Resistor, Lead Free="Lead Free", Length=1mm, Manufacturer Part Number=RC0402FR-071KL, Military Standard=Not, Number of Pins=2, Number of Terminations=2, Packaging="Tape and Reel", Pricing 1="10000=0.00085, 20000=0.00087, 40000=0.00084, 60000=0.00083, 80000=0.00079, 100000=0.00078, 1000000=0.00076 (USD)", Reach SVHC Compliant=Yes, RoHS=Yes, RoHS Compliant=Yes, Series=RC, Size Code=0402, Stock 1=13030000, Supplier 1=Avnet, Supplier Part Number 1=RC0402FR-071KL, Technology="THICK FILM", Termination=SMD/SMT, Tolerance=1%, Voltage Rating (DC)=50V, Width=0.5mm
R24 R25 R28 R29 R30 R31: library part RC0402FR-0710KL, "RES 10K OHM 1% 1/16W 0402", Case Code (Imperial)=0402, Case Code (Metric)=1005, LCSC Part Number=C60490, Manufacturer=Yageo, Max Operating Temperature=155°C, Max Power Dissipation=63mW, Min Operating Temperature=-55°C, Power Rating=62.5mW, Resistance=10kR, Resistance Tolerance=1%, Resistor Type="Thick Film", Supplier Part Number 1=603-RC0402FR-0710KL, Temperature Coefficient=100ppm/°C, Voltage Rating=50V, Case/Package=0402, Category="Chip SMD Resistors", ComponentLink1Description=https://datasheet.ciiva.com/7660/38568-7660787.pdf?src-supplier=Element14, ComponentLink1URL=https://datasheet.ciiva.com/7660/38568-7660787.pdf?src-supplier=Element14, ComponentLink2Description=https://datasheet.ciiva.com/7849/1686128-7849814.pdf?src-supplier=Element14, ComponentLink2URL=https://datasheet.ciiva.com/7849/1686128-7849814.pdf?src-supplier=Element14, ComponentLink3Description=https://datasheet.ciiva.com/7983/1018594-7983486.pdf?src-supplier=Element14, ComponentLink3URL=https://datasheet.ciiva.com/7983/1018594-7983486.pdf?src-supplier=Element14, ComponentLink4Description=https://datasheet.ciiva.com/22747/1018594-22747512.pdf?src-supplier=Element14, ComponentLink4URL=https://datasheet.ciiva.com/22747/1018594-22747512.pdf?src-supplier=Element14, ComponentLink5Description=https://datasheet.ciiva.com/12667/pyu-rc0402-51-rohs-l-6-r-12667067.pdf?src-supplier=Mouser, ComponentLink5URL=https://datasheet.ciiva.com/12667/pyu-rc0402-51-rohs-l-6-r-12667067.pdf?src-supplier=Mouser, ComponentLink6Description=https://datasheet.ciiva.com/7849/1784430-7849813.pdf?src-supplier=Element14, ComponentLink6URL=https://datasheet.ciiva.com/7849/1784430-7849813.pdf?src-supplier=Element14, ComponentLink7Description=https://datasheet.ciiva.com/7849/1784430-7849815.pdf?src-supplier=Element14, ComponentLink7URL=https://datasheet.ciiva.com/7849/1784430-7849815.pdf?src-supplier=Element14, Construction=Rectangular, Depth=0.5mm, Features="Moisture Resistant", Height=0.32mm, Lead Free="Lead Free", Lead Pitch=0.2mm, Length=1mm, Manufacturer Part Number=RC0402FR-0710KL, Military Standard=Not, Number of Pins=2, Number of Terminations=2, Packaging="Tape and Reel", Pricing 1="1=0.10000, 10=0.01400, 50=0.01400, 100=0.00500, 1000=0.00300, 10000=0.00200 (USD)", REACH SVHC="No SVHC", RoHS=Yes, RoHS Compliant=Yes, Series=RC, Stock 1=18648329, Supplier 1=Mouser, Termination=SMD/SMT, Tolerance=1%, Voltage Rating (DC)=50V, Width=0.5mm, Working Voltage=50V
RV1_Relay0 RV1_Relay1 RV1_Relay2 RV1_Relay3 RV1_Relay4 RV1_Relay5 RV1_Relay6: "VARISTOR 68V 500A DISC 7MM", Capacitance=1.2nF, Case/Package=Radial, Clamping Current=2.5A, Clamping Voltage=135V, LCSC Part Number=C1527506, Manufacturer=Panasonic, Max Operating Temperature=85°C, Max Surge Current=500A, Max Varistor Voltage=75V, Max Voltage Rating (AC)=40V, Max Voltage Rating (DC)=56V, Min Operating Temperature=-40°C, Min Varistor Voltage=61V, Package Quantity=1000, Power Rating=20mW, Varistor Voltage=68V, Category=Varistors, ComponentLink1Description=https://datasheet.ciiva.com/11834/0900766b80eefb4d-11834669.pdf?src-supplier=RSComponents, ComponentLink1URL=https://datasheet.ciiva.com/11834/0900766b80eefb4d-11834669.pdf?src-supplier=RSComponents, ComponentLink2Description=https://datasheet.ciiva.com/1278/652464-1278833.pdf?src-supplier=Element14, ComponentLink2URL=https://datasheet.ciiva.com/1278/652464-1278833.pdf?src-supplier=Element14, ComponentLink3Description=https://datasheet.ciiva.com/1283/652464-1283255.pdf?src-supplier=Farnell, ComponentLink3URL=https://datasheet.ciiva.com/1283/652464-1283255.pdf?src-supplier=Farnell, ComponentLink4Description=https://datasheet.ciiva.com/3023/awa0000ce2-3023960.pdf?src-supplier=Avnet, ComponentLink4URL=https://datasheet.ciiva.com/3023/awa0000ce2-3023960.pdf?src-supplier=Avnet, ComponentLink5Description=https://datasheet.ciiva.com/30133/2awa0000ce2-30133483.pdf?src-supplier=Onlinecomponents.com, ComponentLink5URL=https://datasheet.ciiva.com/30133/2awa0000ce2-30133483.pdf?src-supplier=Onlinecomponents.com, ComponentLink6Description=https://datasheet.ciiva.com/16440/awa0000ce2-16440124.pdf?src-supplier=Future+Electronics, ComponentLink6URL=https://datasheet.ciiva.com/16440/awa0000ce2-16440124.pdf?src-supplier=Future+Electronics, ComponentLink7Description=https://datasheet.ciiva.com/24028/awa0000ce2-33884-24028073.pdf?src-supplier=Mouser, ComponentLink7URL=https://datasheet.ciiva.com/24028/awa0000ce2-33884-24028073.pdf?src-supplier=Mouser, ComponentLink8Description=https://datasheet.ciiva.com/1231/652464-1231981.pdf?src-supplier=Newark, ComponentLink8URL=https://datasheet.ciiva.com/1231/652464-1231981.pdf?src-supplier=Newark, Contact Plating=Tin,Matte, Depth=5.2mm, Diameter=7mm, Energy=4.1J, Item Type=Varistor, Lead Free="Lead Free", Lead Pitch=5mm, Lead/Base Style=Radial, Manufacturer Part Number=ERZ-V07D680, Material=Zinc, Max Output Current=2.5A, Mount="Through Hole,Radial", Number of Circuits=1, Packaging=Bulk, Pricing 1="1000=0.07517, 1100=0.07421, 2100=0.07294, 5000=0.07103, 10000=0.07039 (USD)", Radiation Hardening=No, RoHS=Yes, Stock 1=397, Supplier 1=Avnet, Supplier Part Number 1=ERZ-V07D680, Termination=Radial, Thickness=5.2mm, Voltage Rating=75V, Voltage Rating (AC)=40V, Voltage Rating (DC)=56V
SW1: "3.5mm 3.5mm SMDSplicing Black Rectangle button 50mA Surface Mount 7mm SPST 100MΩ 20000 12V 250gf@±50gf SMD Tactile Switches ROHS", LCSC Part Number=C2910695, Manufacturer=YIYUAN, Package=Custom, ComponentLink1Description=LCSC, ComponentLink1URL=https://lcsc.com/product-detail/Tactile-Switches_YIYUAN-YTS-B003-2A_C2910695.html, Item Type="Tactile Switch", Manufacturer Part Number=YTS-B003-2A
U1: "300mA 80dB@(1kHz) 305mV@(300mA) Fixed 3.3V~3.3V Positive 1 5.5V SOT-25-5 Linear Voltage Regulators (LDO) ROHS", LCSC Part Number=C69841, Manufacturer="Torex Semicon", Package=SOT-25-5, ComponentLink1Description=LCSC, ComponentLink1URL=https://www.lcsc.com/product-detail/Linear-Voltage-Regulators-LDO_Torex-Semicon-XC6228D332VR-G_C69841.html, Item Type=IC, Manufacturer Part Number=XC6228D332VR-G
U2: "600mA 60dB 500mV@(600mA) Fixed 3.3V~3.3V Positive 1 7V SOT-89(SOT-89-3) Linear Voltage Regulators (LDO) ROHS", LCSC Part Number=C171498, Manufacturer="UTC(Unisonic Tech)", Package=SOT-89(SOT-89-3), ComponentLink1Description=LCSC, ComponentLink1URL=https://lcsc.com/product-detail/Linear-Voltage-Regulators-LDO_UTC-Unisonic-Tech-LR1107G-33-AB3-C-R_C171498.html, Item Type=IC, Manufacturer Part Number=LR1107G-33-AB3-C-R
U3: "300mA 80dB@(1kHz) 410mV@(300mA) Fixed 1.8V~1.8V Positive 1 5.5V SOT-25-5 Linear Voltage Regulators (LDO) ROHS", LCSC Part Number=C216644, Manufacturer="Torex Semicon", Package=SOT-25-5, ComponentLink1Description=LCSC, ComponentLink1URL=https://www.lcsc.com/product-detail/Linear-Voltage-Regulators-LDO_Torex-Semicon-XC6228D182VR-G_C216644.html, Item Type=IC, Manufacturer Part Number=XC6228D182VR-G
U4: "SENSOR RH PRESSURE TEMP VOC", LCSC Part Number=C125972, Manufacturer="Bosch Sensortec", Max Operating Temperature=85°C, Min Operating Temperature=-40°C, Supplier Part Number 1=7107186, Category=Uncategorized, ComponentLink1Description=https://ae-bst.resource.bosch.com/media/_tech/media/application_notes/BST-BME680-HS000-05.pdf?src-supplier=Digi-Key, ComponentLink1URL=https://ae-bst.resource.bosch.com/media/_tech/media/application_notes/BST-BME680-HS000-05.pdf?src-supplier=Digi-Key, ComponentLink2Description=https://ae-bst.resource.bosch.com/media/_tech/media/product_flyer/BST-BME680-FL000.pdf?src-supplier=Digi-Key, ComponentLink2URL=https://ae-bst.resource.bosch.com/media/_tech/media/product_flyer/BST-BME680-FL000.pdf?src-supplier=Digi-Key, Item Type="Temperature Sensor", Manufacturer Part Number=BME680, Output Type=SPI,I2C, Pricing 1="1=9.84000, 20=8.81000, 125=8.18000, 500=7.71000, 3000=7.09000 (USD)", RoHS=No, Sensor Type=Temperature, Stock 1=64, Supplier 1="Future Electronics"
U5 U6 U7: "IC DECODER/DEMUX 3-8 INV 16SOIC", LCSC Part Number=C6061, Manufacturer=Nexperia, Category="Decoders and Multiplexers", ComponentLink1Description=LCSC, ComponentLink1URL=https://www.lcsc.com/product-detail/Signal-Switches-Encoders-Decoders-Multiplexers_Nexperia-74LVC138AD-118_C6061.html, Item Type=IC, Manufacturer Part Number=74LVC138AD,118, Pricing 1="2995=0.11690, 3000=0.11440, 6000=0.11189, 15000=0.10939, 30000=0.10688, 150000=0.10438, 300000=0.10187 (USD)", RoHS=Yes, RoHS Compliant=Yes, Stock 1=17684, Supplier 1=Avnet, Supplier Part Number 1=74LVC138AD,118
U8 U9 U10: "SOIC-14 Inverters ROHS", Case/Package=SOIC, High Level Output Current=-12mA, LCSC Part Number=C2860778, Low Level Output Current=12mA, Manufacturer="Texas Instruments", Max Operating Temperature=125°C, Max Supply Voltage=5.5V, Min Operating Temperature=-40°C, Min Supply Voltage=2V, Package Quantity=50, Quiescent Current=20uA, Supplier Part Number 1=296-1678-5-ND, Category="Logic Gates", ComponentLink1Description=https://datasheet.ciiva.com/27050/917231-27050962.pdf?src-supplier=Jameco, ComponentLink1URL=https://datasheet.ciiva.com/27050/917231-27050962.pdf?src-supplier=Jameco, ComponentLink2Description=https://datasheet.ciiva.com/7948/1633820-7948979.pdf?src-supplier=Element14, ComponentLink2URL=https://datasheet.ciiva.com/7948/1633820-7948979.pdf?src-supplier=Element14, ComponentLink3Description=https://datasheet.ciiva.com/15089/getdatasheetpartid-253475-15089486.pdf?src-supplier=Verical, ComponentLink3URL=https://datasheet.ciiva.com/15089/getdatasheetpartid-253475-15089486.pdf?src-supplier=Verical, ComponentLink4Description=https://datasheet.ciiva.com/1866/sn74lv14a-1866324.pdf?src-supplier=Digi-Key, ComponentLink4URL=https://datasheet.ciiva.com/1866/sn74lv14a-1866324.pdf?src-supplier=Digi-Key, ComponentLink5Description=https://datasheet.ciiva.com/14290/sn74lv14a-14290269.pdf?src-supplier=Avnet, ComponentLink5URL=https://datasheet.ciiva.com/14290/sn74lv14a-14290269.pdf?src-supplier=Avnet, Height=1.58mm, Input Type="SCHMITT TRIGGER", Item Type=IC, Lead Free="Lead Free", Length=8.65mm, Logic Function="Buffer,Inverter,Schmitt Trigger", Manufacturer Part Number=SN74LV14AD, Mount="Surface Mount", Number of Bits=6, Number of Circuits=6, Number of Elements=6, Number of Gates=6, Number of Inputs=1, Number of Pins=14, Output Current=12mA, Packaging=Rail/Tube, Pricing 1="1=1.16000, 10=1.04100, 25=0.98840, 100=0.81190, 250=0.75892, 500=0.67066, 1000=0.52947, 2500=0.49950 (USD)", Propagation Delay=27ns, Radiation Hardening=No, Reach SVHC Compliant=Yes, RoHS=Yes, RoHS Compliant=Yes, Schmitt Trigger Input=Yes, Series=74LV, Stock 1=2467, Supplier 1=Digi-Key, Technology=CMOS, Turn-On Delay Time=12ns, Weight=0.004318oz, Width=3.91mm
U11 U12: "100uA@50V 3V@2V,300mA 1.6V@350mA 4mA@12V 100uA@50V 1.25V@350mA 500mA 25pF SOP-16_150mil Darlington Transistor Arrays ROHS", LCSC Part Number=C181730, Manufacturer=Mixic, Package=SOP-16_150mil, ComponentLink1Description=LCSC, ComponentLink1URL=https://www.lcsc.com/product-detail/Darlington-Transistor-Arrays_Mixic-ULN2003A_C181730.html, Item Type=IC, Manufacturer Part Number=ULN2003A
U13_Relay0 U13_Relay1 U13_Relay2 U13_Relay3 U13_Relay4 U13_Relay5 U13_Relay6: "80V 3750V 2us@2mA,100Ω -55℃~+125℃ 50mA 3us@2mA,100Ω 0.4V@2.4mA,8mA 1 6V 1.2V Phototransistor DC SOP-4-2.6mm Optocouplers - Phototransistor Output ROHS", LCSC Part Number=C282477, Manufacturer=Orient, Package=SOP-4-2.6mm, ComponentLink1Description=LCSC, ComponentLink1URL=https://www.lcsc.com/product-detail/Optocouplers-Phototransistor-Output_Orient-OR-3H7B-TP-G_C282477.html, Item Type=Optocoupler, Manufacturer Part Number=OR-3H7B-TP-G
U14: "IC TRANSLATOR BIDIR 20TSSOP", LCSC Part Number=C17206, Manufacturer="Texas Instruments", Package=20-TSSOP, ComponentLink1Description=LCSC, ComponentLink1URL=https://www.lcsc.com/product-detail/Translators-Level-Shifters_Texas-Instruments-TXS0108EPWR_C17206.html, Item Type=IC, Manufacturer Part Number=TXS0108EPWR
U15: "SMD MODULE, ESP32-S3, 8 MB SPI F", LCSC Part Number=C2913198, Manufacturer="Espressif Systems", Supplier Part Number 1=1965-ESP32-S3-WROOM-1-N8CT-ND, Category=Uncategorized, ComponentLink1Description=LCSC, ComponentLink1URL=https://www.lcsc.com/product-detail/WiFi-Modules_Espressif-Systems-ESP32-S3-WROOM-1-N8_C2913198.html, Item Type=Module, Manufacturer Part Number=ESP32-S3-WROOM-1-N8, Pricing 1="1=3.52000 (USD)", RoHS=No, Stock 1=7933, Supplier 1=Digi-Key
V1: library part "Logo Ezlo_M", Sheetfile="adv thermostat.kicad_sch"

## Free pads (board coordinates)
  round 2.5 hole 2.5 unplated: MH1(4.506,73.009) MH2(0.006,0.009) MH3(92.006,-0.491) MH4(90.006,73.009)

## Via types
v1: diameter 0.6, hole 0.3, Top to Bottom, 391 vias
v2: diameter 0.8, hole 0.4, Top to Bottom, 26 vias

## Nets (pads, with @x,y where several pads share a name; then routed paths per layer and width w, separated by ;. In a path a pad name is that pad's centre, name@x,y a point inside that pad or via, vN(x,y) a via of type N, cw(c..) or ccw(c..) an arc to the next point about the centre after c; other vN are vias at no path point)
1V8_SENSOR: C19.1 C20.2 FB5.1 J2.7 P3.1 U3.5 | length 25.8
  Top w0.254: FB5.1@66.085,70.079 66.085,71.073 66.234,71.222 v1(66.777,71.222) ; J2.7@73.164,69.958 73.164,70.856 73.313,71.005 77.967,71.005 78.332,70.64 v1(78.332,69.496) P3.1@78.332,65.259 P3.1@78.332,65.113
  Bottom w0.762: v1(66.777,71.222) 76.606,71.222 v1(78.332,69.496)
3V3_C: C5.1 C6.2 C7.1 C14.1 FB3.1 FB4.1 P1.1 U1.5 | length 6.4
  Top w0.508: C7.1@90.703,64.046 FB4.1@90.703,64.92 ; FB4.1@90.703,64.928 FB4.1@90.703,64.92 ; U1.5@92.821,61.415 92.835,61.43 92.835,64.68 C14.1@92.85,64.694 92.85,64.732 92.824,64.757 92.723,64.757 92.552,64.928 FB3.1@91.872,64.928 90.711,64.928 FB4.1@90.703,64.92
3V3_SENSOR: C12.1 FB3.2 J2.8 P2.1 | length 26.4
  Top w0.254: J2.8@72.664,69.958 72.664,71.064 73.076,71.476 84.912,71.476 85.649,70.739 P2.1@85.649,68.961 ; FB3.2@91.872,65.628 FB3.2@91.887,65.644
  Top w0.508: FB3.2@91.872,65.628 92.824,65.628 92.85,65.653 C12.1@92.85,65.659
  Top w0.635: P2.1@85.649,68.961 90.297,68.961 92.85,66.408 C12.1@92.85,65.659
5V_TABLET: F2.2 J5.5 J5.6 P18.1 | length 18.7
  Top w1.016: 2.248,61.862 1.968,61.862 1.219,61.112 1.219,52.019 2.057,51.181 F2.2@6.32,51.181
  Bottom w1.016: P18.1@-0.584,50.013 -0.501,50.013 -0.33,50.183 0.044,50.183 v2(1.549,51.689)
+1V8: J5.2 P19.1 Q4.1 Q5.1 R28.2 R30.2 | length 8.7